# EAGLE board baseBoard2 (EAGLE 9.6.2)
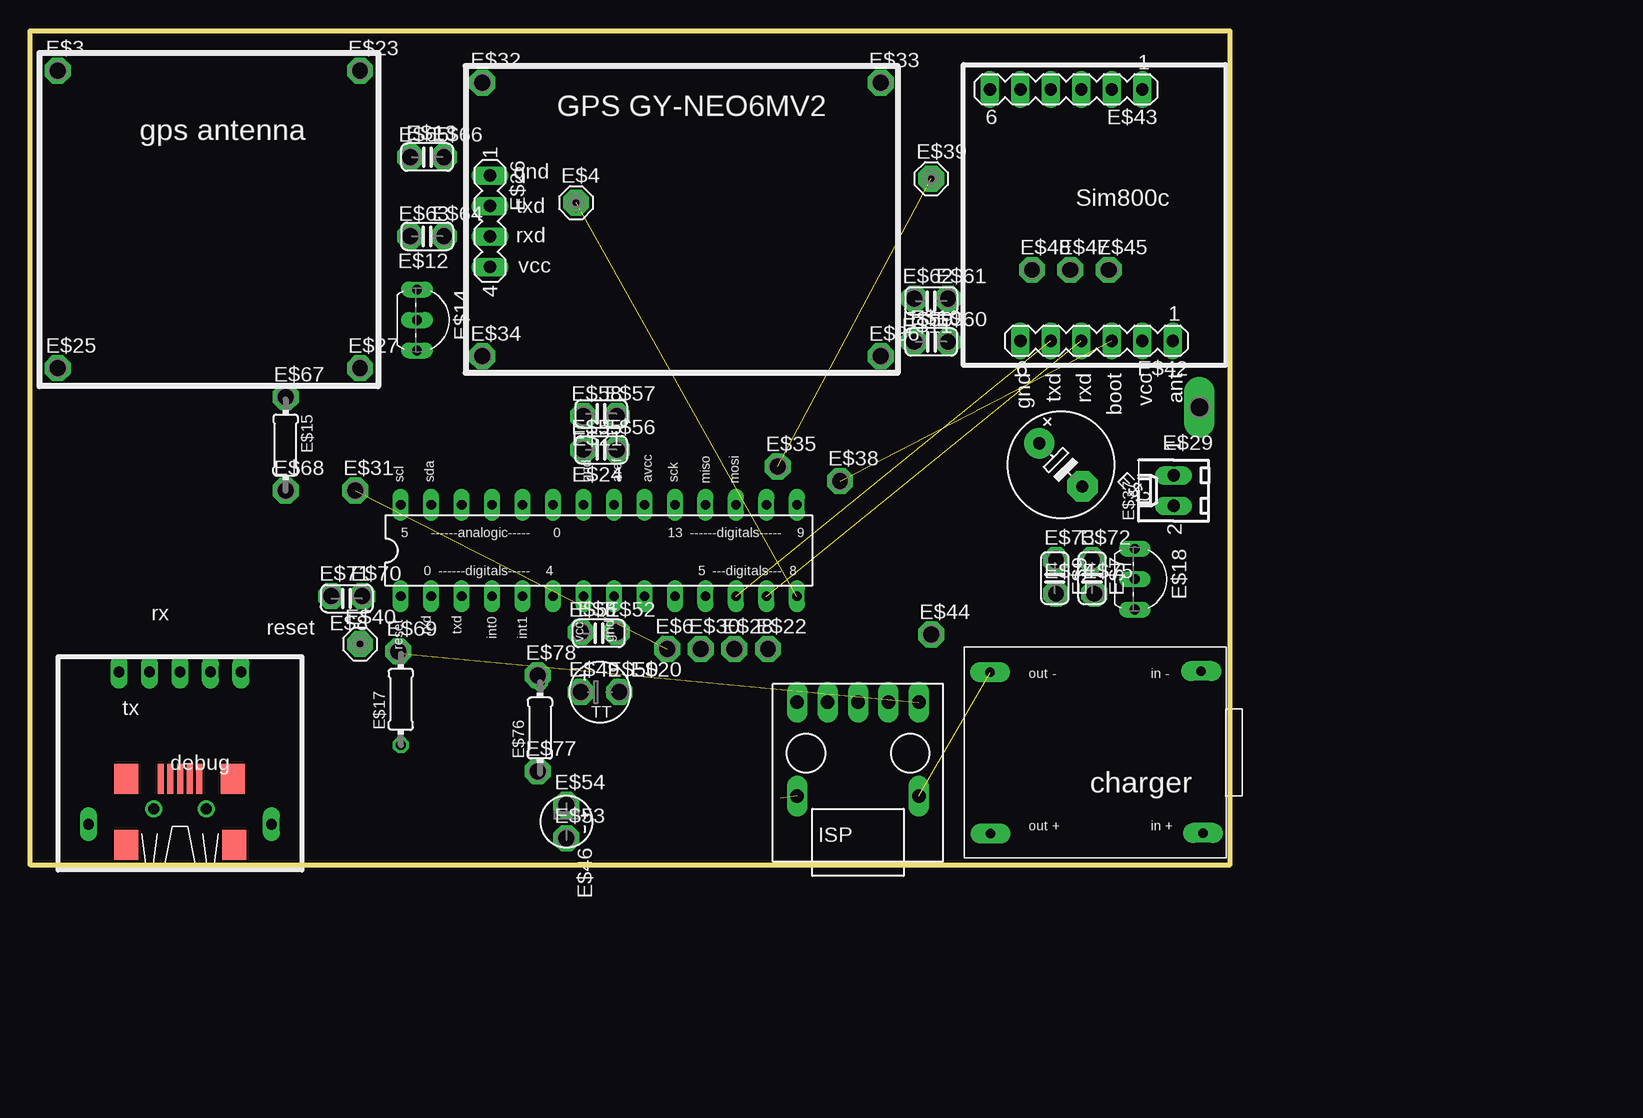
[diagram p0: board, top side]
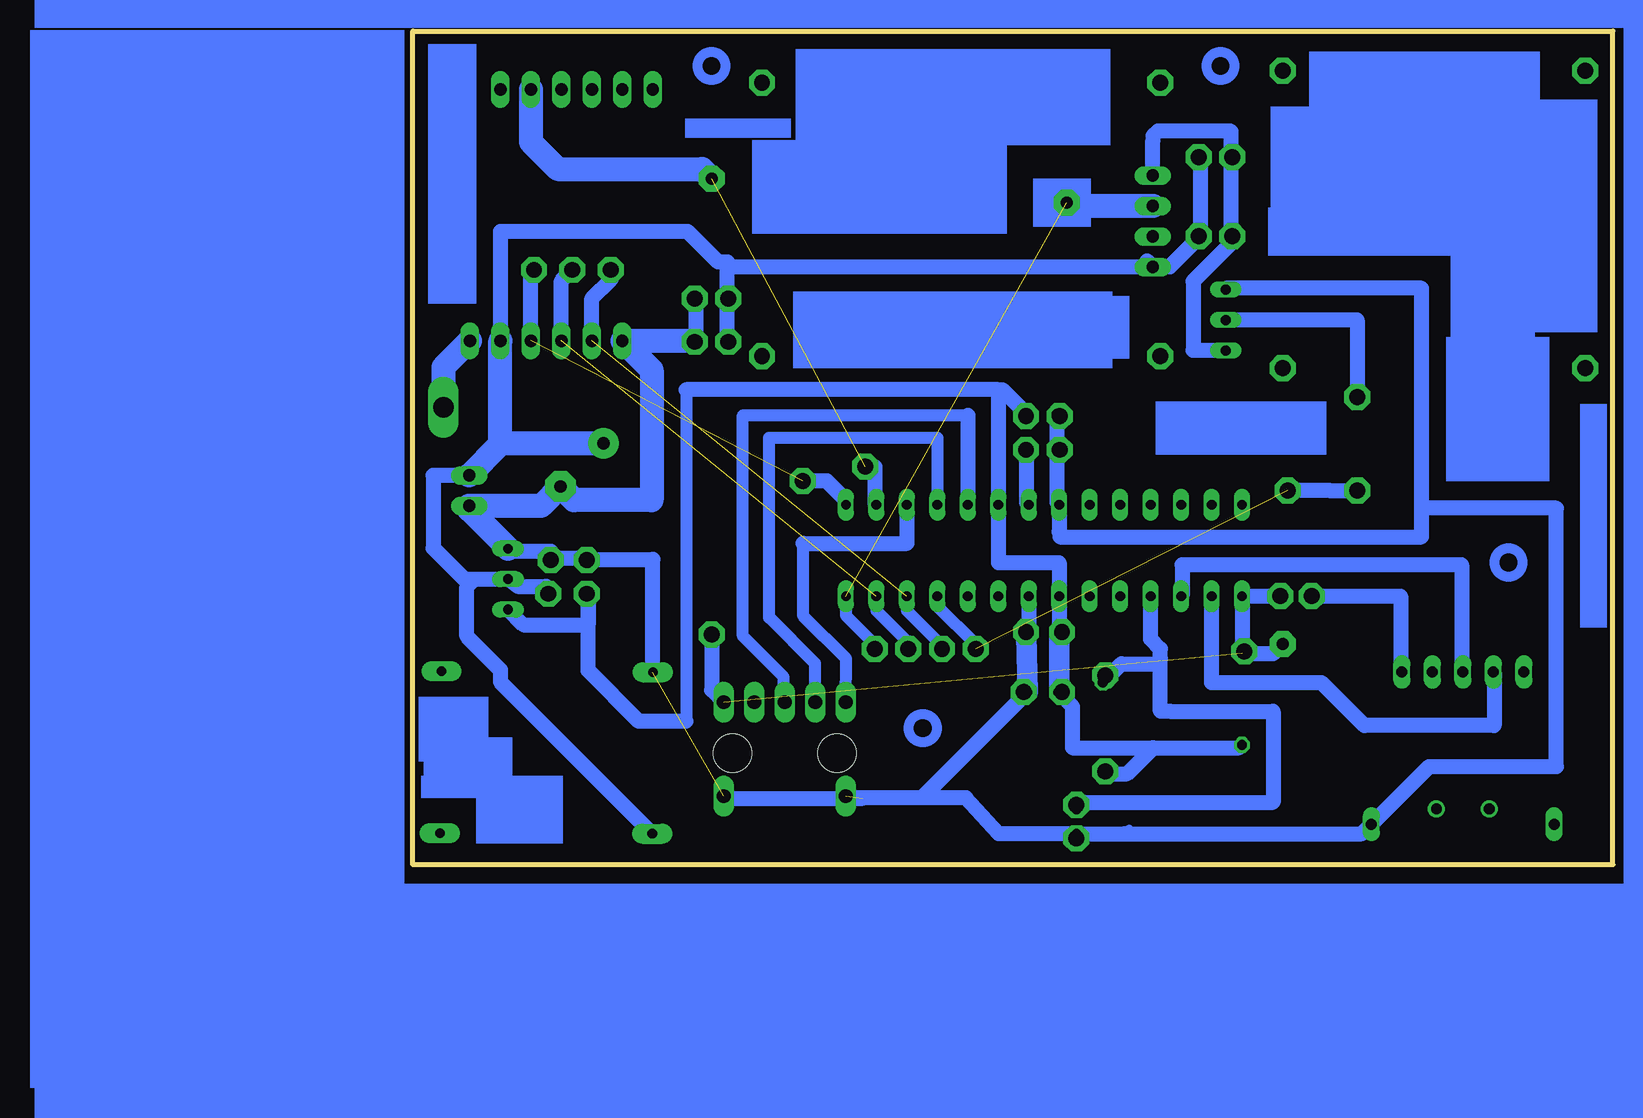
[diagram p1: board, bottom side, seen from below]

Size 100 x 69.5 mm. Coordinates in mm from the lower left corner, seen from the top.
Outline: 0,0 0,69.5 100,69.5 100,0 0,0
Copper layers (1*16): Top 0.035mm / dielectric 1.5mm / Bottom 0.035mm
Design rules "default *": minimum track width 0.7mm, minimum drill 24mil, track to track 8mil, track to pad 8mil, pad to pad 8mil, via to via 8mil, smd to smd 8mil, copper to edge 40mil, drill to drill 8mil, minimum pad ring 10mil, minimum via ring 8mil, stop-mask expansion 4mil, vias tented up to drill 0mil, thermal gap 10mil

## Footprints (pad centres in the part's own frame; a part is rotated, then mirrored left to right if it is on the bottom)
USBMINIB = smd 2.5 x 0.5: D+ -3.85,0; D- -3.85,0.8; GND -3.85,-1.6; ID -3.85,-0.8; VBUS -3.85,1.6 | drill 0.9 long: P$1 5.08,0; P$2 5.08,2.54; P$3 5.08,5.08; P$4 5.08,-2.54; P$5 5.08,-5.08; P$6 -7.62,7.62; P$7 -7.62,-7.62 | drill 0.9: P$8 -6.35,2.2; P$9 -6.35,-2.2 | smd 2.5 x 2: P$10 -9.35,-4.5; P$11 -9.35,4.5; P$12 -3.85,-4.4; P$13 -3.85,4.5
E5-8,5 = drill 1.016 pad 2.54: + -2.54,0 | drill 1.016 pad 2.54 octagon: - 2.54,0
P1-13 = drill 1.321 pad 2.159 octagon: TP 0,0
MCS10B = drill 1.016 pad 2.159 octagon: MP 0,0
C025-024X044 = drill 0.813 octagon: 1 -1.27,0; 2 1.27,0
TO92- = drill 0.813 long: 1 2.54,0; 2 0,0; 3 -2.54,0
0204/7 = drill 0.813 octagon: 1 -3.81,0; 2 3.81,0
USB-MICRO-PCB = drill 1.143 long: P$1 -5.08,6.35; P$2 -2.54,6.35; P$3 0,6.35; P$4 2.54,6.35; P$5 5.08,6.35; P$6 5.08,-1.47; P$7 -5.08,-1.47 | hole 3.2: -4.34,2.12; 4.36,2.12
ATMEGA328 = drill 0.813 long: 1 -16.51,-3.81; 2 -13.97,-3.81; 3 -11.43,-3.81; 4 -8.89,-3.81; 5 -6.35,-3.81; 6 -3.81,-3.81; 7 -1.27,-3.81; 8 1.27,-3.81; 9 3.81,-3.81; 10 6.35,-3.81; 11 8.89,-3.81; 12 11.43,-3.81; 13 13.97,-3.81; 14 16.51,-3.81; 15 16.51,3.81; 16 13.97,3.81; 17 11.43,3.81; 18 8.89,3.81; 19 6.35,3.81; 20 3.81,3.81; 21 1.27,3.81; 22 -1.27,3.81; 23 -3.81,3.81; 24 -6.35,3.81; 25 -8.89,3.81; 26 -11.43,3.81; 27 -13.97,3.81; 28 -16.51,3.81
TT2D5 = drill 0.813: + -1.27,0 | drill 0.813 octagon: - 1.27,0
MA04-1 = drill 1.016 long: 1 -3.81,0; 2 -1.27,0; 3 1.27,0; 4 3.81,0
P1-17Y = drill 1.702 pad 2.121 long: TP 0,0
6410-02 = drill 1.016 long: 1 1.27,0; 2 -1.27,0
LIPO_CHARGER = drill 0.8 pad 1.676 long: P$5 -8.3,6.85; P$6 9.3,6.95; P$7 -8.25,-6.6; P$8 9.45,-6.55
MA06-1 = drill 1.016 long: 1 -6.35,0; 2 -3.81,0; 3 -1.27,0; 4 1.27,0; 5 3.81,0; 6 6.35,0
E2-4 = drill 0.813 pad 1.27: + -1.016,0 | drill 0.813 pad 1.27 octagon: - 1.016,0

## Placement (x,y rotation side)
E$1  [USBMINIB]  12.5,11 90 top
E$2  [E5-8,5]  85.9,33.34 315 top
E$3  [P1-13]  2.3,66.2 0 top
E$4  [MCS10B]  45.5,55.2 0 top
E$5  100nF  [C025-024X044]  47.4,19.3 0 top
E$6  [P1-13]  53.1,18 0 top
E$7  1uF  [C025-024X044]  88.5,23.9 270 top
E$8  0.1uF  [C025-024X044]  26.4,22.2 180 top
E$9  1uF  [C025-024X044]  85.4,23.9 270 top
E$10  100nF  [C025-024X044]  75.1,43.6 0 top
E$11  10uF  [C025-024X044]  75.1,47 180 top
E$12  100nF  [C025-024X044]  33.1,52.4 180 top
E$13  10uF  [C025-024X044]  33.1,59 0 top
E$14  S9013 h331  [TO92-]  32.26,45.42 270 top
E$15  1k  [0204/7]  21.3,35 270 top
E$16  [USB-MICRO-PCB]  69,7.2 0 top
E$17  10k  [0204/7]  30.9,13.8 90 top
E$18  MCP1702  [TO92-]  92.06,23.82 270 top
E$19  [ATMEGA328]  47.4,26.2 0 top
E$20  10uF  [TT2D5]  47.5,14.4 0 top
E$21  100nF  [C025-024X044]  47.6,37.6 180 top
E$22  [P1-13]  61.5,18 0 top
E$23  [P1-13]  27.5,66.2 0 top
E$24  100nF  [C025-024X044]  47.6,34.6 180 top
E$25  [P1-13]  2.3,41.4 0 top
E$26  [MA04-1]  38.33,53.66 270 top
E$27  [P1-13]  27.5,41.4 0 top
E$28  [P1-13]  58.7,18 0 top
E$29  [P1-17Y]  97.45,38.13 180 top
E$30  [P1-13]  55.9,18 0 top
E$31  [P1-13]  27.1,31.2 0 top
E$32  [P1-13]  37.7,65.2 0 top
E$33  [P1-13]  70.9,65.2 0 top
E$34  [P1-13]  37.7,42.4 0 top
E$35  [P1-13]  62.3,33.2 0 top
E$36  [P1-13]  70.9,42.4 0 top
E$37  [6410-02]  95.3,31.2 90 top
E$38  [P1-13]  67.5,32 0 top
E$39  [MCS10B]  75.1,57.2 0 top
E$40  [MCS10B]  27.5,18.4 0 top
E$41  [LIPO_CHARGER]  88.3,9.2 0 top
E$42  [MA06-1]  88.88,43.69 180 top
E$43  [MA06-1]  86.34,64.65 180 top
E$44  [P1-13]  75.1,19.2 0 top
E$45  [P1-13]  89.9,49.6 0 top
E$46  TILT SENSOR  [E2-4]  44.7,3.6 270 top
E$47  [P1-13]  86.7,49.6 0 top
E$48  [P1-13]  83.5,49.6 0 top
E$49  [P1-13]  45.9,14.4 0 top
E$50  [P1-13]  49.1,14.4 0 top
E$51  [P1-13]  45.9,19.4 0 top
E$52  [P1-13]  48.9,19.4 0 top
E$53  [P1-13]  44.7,2.2 0 top
E$54  [P1-13]  44.7,5 0 top
E$55  [P1-13]  46.1,34.6 0 top
E$56  [P1-13]  48.9,34.6 0 top
E$57  [P1-13]  48.9,37.4 0 top
E$58  [P1-13]  46.1,37.4 0 top
E$59  [P1-13]  73.7,43.6 0 top
E$60  [P1-13]  76.5,43.6 0 top
E$61  [P1-13]  76.5,47.2 0 top
E$62  [P1-13]  73.7,47.2 0 top
E$63  [P1-13]  31.7,52.4 0 top
E$64  [P1-13]  34.5,52.4 0 top
E$65  [P1-13]  31.7,59 0 top
E$66  [P1-13]  34.5,59 0 top
E$67  [P1-13]  21.3,39 0 top
E$68  [P1-13]  21.3,31.2 0 top
E$69  [P1-13]  30.7,17.8 0 top
E$70  [P1-13]  27.7,22.4 0 top
E$71  [P1-13]  25.1,22.4 0 top
E$72  [P1-13]  88.5,25.4 0 top
E$73  [P1-13]  85.5,25.4 0 top
E$74  [P1-13]  85.5,22.6 0 top
E$75  [P1-13]  88.7,22.6 0 top
E$76  10k  [0204/7]  42.5,11.4 90 top
E$77  [P1-13]  42.3,7.8 0 top
E$78  [P1-13]  42.3,15.8 0 top

## Library data of the parts
E$1 E$16 E$19 E$41 = LSGPackages
E$2 = ref-packages-longpad
E$3 E$6 E$22 E$23 E$25 E$27-E$36 E$38 E$44 E$45 E$47-E$75 E$77 E$78 = testpad
E$4 E$39 E$40 = solpad
E$5 E$7-E$13 E$21 E$24 E$46 = rcl
E$14 E$18 = transistor-fet
E$15 E$17 E$76 = eagle-ltspice
E$20 = resistor
E$26 E$42 E$43 = con-lstb
E$37 = con-molex

## Nets
GND: E$1.P$7 E$2.- E$5.2 E$7.1 E$9.1 E$10.2 E$11.1 E$14.3 E$16.P$6 E$16.P$7 E$18.3 E$19.8 E$19.22 E$20.- E$21.2 E$24.2 E$37.2 E$41.P$5 E$42.6 E$46.-
S$2: E$12.2 E$13.1 E$14.1 E$26.1
S$3: E$6.TP E$15.2 E$19.11 E$31.TP
S$4: E$19.21 E$24.1
S$5: E$16.P$2 E$19.18
S$8: E$19.12 E$30.TP E$42.5 E$48.TP
S$9: E$19.13 E$28.TP E$42.4 E$47.TP
S$10: E$19.15 E$38.TP E$42.3 E$45.TP
S$11: E$16.P$3 E$19.19
S$12: E$14.2 E$15.1
S$13: E$16.P$1 E$19.17
S$14: E$1.P$2 E$19.2
S$15: E$1.P$1 E$19.3
S$16: E$1.P$5 E$8.2
S$18: E$4.MP E$19.14 E$22.TP E$26.2
S$19: E$19.16 E$35.TP E$39.MP E$43.2
S$20: E$8.1 E$16.P$5 E$17.2 E$19.1 E$40.MP E$44.TP
S$21: E$29.TP E$42.1
S$22: E$19.4 E$46.+ E$76.2
VCC3.3V: E$5.1 E$9.2 E$17.1 E$18.1 E$19.7 E$19.20 E$20.+ E$21.1 E$76.1
VCC5.1V: E$2.+ E$7.2 E$10.1 E$11.2 E$12.1 E$13.2 E$18.2 E$26.4 E$37.1 E$41.P$7 E$42.2

## Tracks (layer width: path | path; a pad name or v marks a point on that pad's centre or on a via)
GND  (2 unrouted)
  Bottom 0.7: 63.8,5.6 E$16.P$7 64.1,5.55 | 44.64,2.54 E$46.- | E$16.P$6 73.9,5.55 | 76.46,43.69 E$10.2 | 95.3,29.6 E$37.2 | 46.33,30.21 E$19.22 | 32.19,48.06 E$14.3 | 40.3,2.98 40.7,2.58
  Bottom 1.27: 73.9,5.55 62.5,5.55 | E$10.2 E$11.1 | E$41.P$5 80,25.45 85.31,25.45 E$9.1 85.6,25.57 88.3,25.57 E$7.1 88.5,26.16 91.86,26.16 E$18.3 | E$19.8 E$5.2 | 57.57,5.6 E$20.- | 57.57,5.6 53.91,5.6 51.17,2.58 E$46.- | 57.57,5.6 63.8,5.6 | 44.64,2.54 44.6,2.58 40.7,2.58 20.92,2.58 E$1.P$7 15.3,8.2 4.7,8.2 4.7,29.74 15.93,29.74 | E$21.2 E$24.2 46.33,30.21 | E$19.22 46.13,27.77 46.07,27.34 15.93,27.34 15.93,29.74 | 32.19,48.06 15.93,48.06 15.93,29.74
  Bottom 1.7: E$5.2 arc4 48.87,19.1 E$20.-
  Bottom 2: 76.46,43.69 E$42.6 80.1,41.26 80.1,30.4 86.55,30.4 E$2.- 89.31,29.93 E$37.2 | E$18.3 95.3,29.6
S$2
  Bottom 0.7: 38.33,60.4 38.33,60.77 | 31.9,61.2 31.83,61.13
  Bottom 1.27: E$26.1 38.33,60.4 | 38.33,60.77 37.9,61.2 31.9,61.2 | 31.83,61.13 E$13.1 E$12.2 31.83,51.8 34.98,48.65 34.98,42.88 E$14.1
S$3  (1 unrouted)
  Bottom 0.7: 23.51,31.2
  Bottom 1.016: E$19.11 56.29,21.59 53.1,18.4
  Bottom 1.27: 53.1,18.4 E$6.TP | 23.51,31.2 22.3,31.2 E$15.2 | 23.51,31.2 E$31.TP
S$4
  Bottom 0.7: 48.87,30.21 E$19.21
  Bottom 1.27: E$24.1 48.87,30.21
S$5
  Bottom 0.7: E$16.P$2 66.5,13.59
  Bottom 1.016: 66.5,13.59 66.5,16.8 70.3,20.6 70.3,35.61 56.29,35.61 E$19.18
S$8  (1 unrouted)
  Bottom 1.016: E$19.12 58.83,21.19 55.9,18.26
  Bottom 1.27: 55.9,18.26 E$30.TP | E$42.5 85.07,47.23 83.5,48.8 E$48.TP
S$9  (1 unrouted)
  Bottom 1.016: E$19.13 61.37,21.19 58.7,18.52
  Bottom 1.27: 58.7,18.52 E$28.TP | E$42.4 87.61,48.69 E$47.TP
S$10  (1 unrouted)
  Bottom 1.27: E$19.15 63.91,30.41 65.5,32 E$38.TP | E$42.3 90.15,49.35 E$45.TP
S$11
  Bottom 1.016: 53.75,37.49 72.5,37.49 72.5,19.06 69.1,15.66 69.1,13.65 E$16.P$3
  Bottom 1.27: 53.75,37.49 E$19.19
S$12
  Bottom 1.27: E$15.1 21.3,45.42 E$14.2
S$13
  Bottom 0.7: E$16.P$1
  Bottom 1.016: E$16.P$1 63.9,17.2 67.5,20.8 67.5,26.8
  Bottom 1.27: 67.5,26.8 58.83,26.8 E$19.17
S$14
  Bottom 0.7: E$1.P$2 9.9,16.02
  Bottom 1.27: 9.9,16.02 9.9,11.6 20.7,11.6 24.27,15.17 33.43,15.17 E$19.2
S$15
  Bottom 0.7: E$1.P$1 12.6,16.18 | E$19.3 35.9,22.46
  Bottom 1.27: 12.6,16.18 12.6,25 35.9,25 35.9,22.46
S$16
  Bottom 0.7: E$8.2 24.93,22.4 | E$1.P$5 17.68,16.18
  Bottom 1.27: 24.93,22.4 17.68,22.4 17.68,16.18
S$18  (1 unrouted)
  Bottom 0.7: 45.23,54.93 E$4.MP
  Bottom 1.016: E$19.14 63.91,20.79 61.5,18.38
  Bottom 1.27: 61.5,18.38 E$22.TP
  Bottom 2: E$26.2 45.23,54.93
S$19  (1 unrouted)
  Bottom 1.27: E$35.TP 61.5,33.2 61.5,30.14 E$19.16
  Bottom 2: E$43.2 90.15,60.25 87.91,58 75.9,58 E$39.MP
S$20  (1 unrouted)
  Bottom 0.7: E$19.1 | E$8.1 27.87,22.4 | E$17.2
  Bottom 1.27: E$19.1 27.87,22.4 | E$19.1 E$17.2 | E$17.2 28.3,17.6 E$40.MP | E$44.TP 75.1,14.57 E$16.P$5
S$21
  Bottom 2: E$42.1 97.45,41.48 E$29.TP
S$22
  Bottom 0.7: 36.91,12.8 36.91,12.79 | 38.15,16.75 37.7,17.2
  Bottom 1.27: E$46.+ 44.11,5.21 28.3,5.21 28.3,12.8 36.91,12.8 | 36.91,12.79 37.7,12.79 37.7,17.2 37.7,18 38.51,18.81 E$19.4 | 38.15,16.75 40.96,16.75 E$76.2
VCC3.3V
  Bottom 0.7: 51.21,39.4 50.3,39.4 50.3,39.37 50.47,39.2
  Bottom 0.813: 46.13,14.5 E$20.+
  Bottom 1.016: 77.23,39.6 77.23,11.97
  Bottom 1.27: 51.21,39.6 50.87,39.6 50.47,39.2 E$21.1 | 51.21,39.6 51.21,39.4 E$19.20 51.21,25.2 46.13,25.2 E$19.7 E$5.1 | 77.23,11.97 81.18,11.97 85.4,16.19 E$9.2 85.4,20 90.78,20 E$18.1 | 51.21,39.6 77.23,39.6 | 38.3,9.76 45.03,9.76 45.03,13.2 E$20.+ | 38.3,9.76 31.13,9.76 E$17.1 | E$76.1 40.47,7.59 38.3,9.76
  Bottom 1.7: E$5.1 46.13,14.5
VCC5.1V
  Bottom 0.7: E$18.2 94.88,23.82 | E$42.2 | 73.83,50.2 73.78,50.25
  Bottom 1.27: E$41.P$7 92.7,15.25 92.7,16.25 95.5,19.05 95.5,23.2 94.88,23.82 | E$7.2 88.89,23.22 91.26,23.22 E$18.2 95.72,23.82 98.3,26.4 98.3,32.47 E$37.1 | E$10.1 E$11.2 73.83,49.85 | 73.83,50.2 73.83,49.85 | 73.83,49.85 E$26.4 | E$26.4 38.81,50.33 | E$13.2 E$12.1 36.92,49.85 E$26.4 | 73.78,50.25 74.55,50.25 77.1,52.8 92.7,52.8 E$42.2
  Bottom 2: E$2.+ 92.7,35.14 | 92.7,35.14 92.7,35.07 E$37.1 | 92.7,35.14 E$42.2
(copper drawn outside any net)
  shapes: Bottom area x24, Bottom circle x4

## Text on the board
tPlace: GPS GY-NEO6MV2 | gps antenna | gnd | Sim800c | txd | rxd | vcc | gnd | txd | rxd | boot | vcc | ant | rx | reset | tx | debug | charger | ISP